# Altium PCB DIOT_Sampler_Adapter.PCBDOC (part 2 of 3)
Units mm, origin at the board's own origin, x right, y up, seen from the top; angles counter-clockwise.
Board outline 37 x 98.9 mm, 4 copper layers (L1, P2, L3, L4), stack 1.6 mm thick; 18 components, 14 nets, 57 pads, 0 vias.
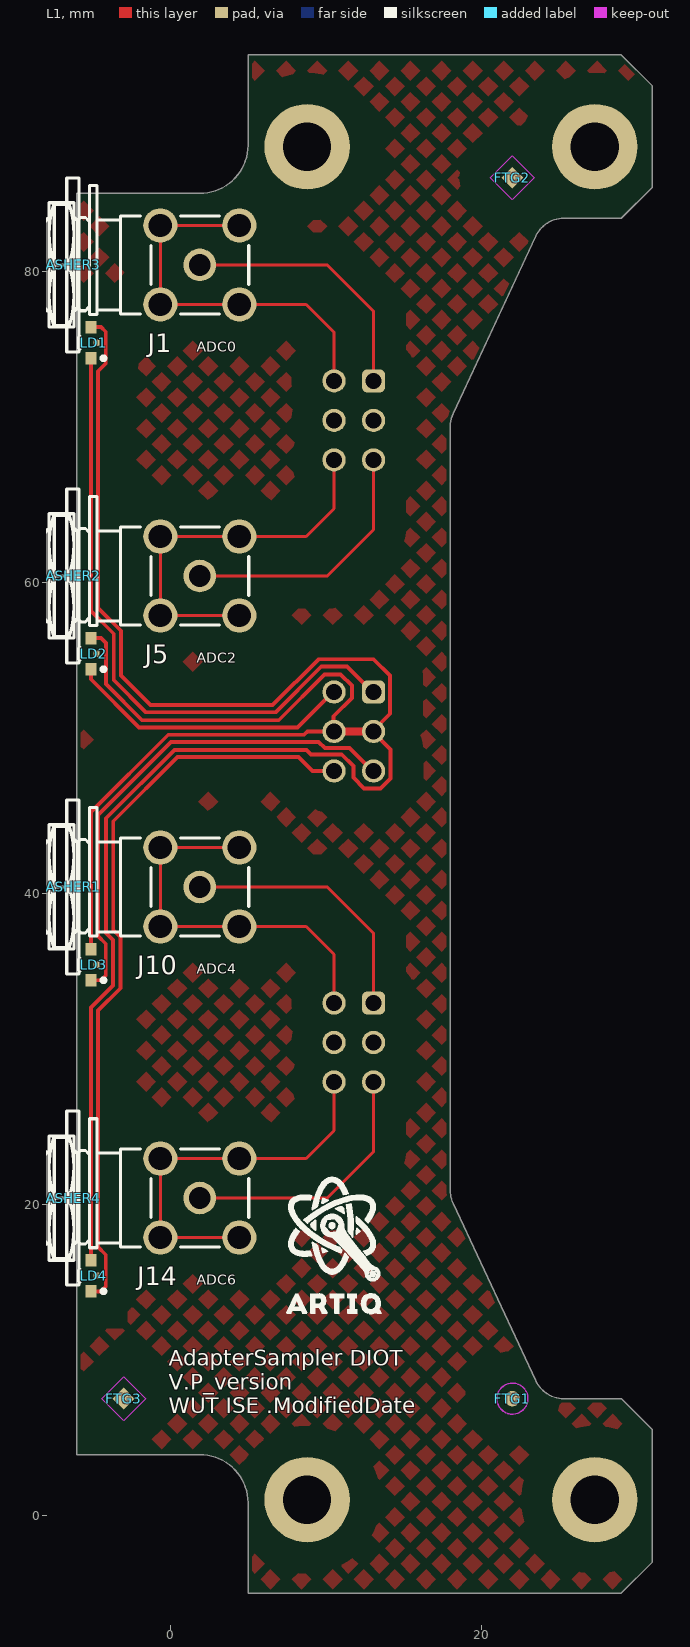
[diagram p0: L1 view]

## Keep-outs (continued)
KeepOutLayer: (continued)
  lines w0.254: -13.883,215.207 14.444,186.88 ; -13.883,217.207 14.444,188.88 ; -13.883,247.207 14.444,218.88 ; -13.883,249.207 14.444,220.88 ; -13.883,279.207 14.444,250.88 ; -13.883,281.207 14.444,252.88 ; -13.883,311.207 14.444,282.88 ; -13.883,313.207 14.444,284.88 ; -13.883,339.207 14.444,310.88 ; -13.883,341.207 14.444,312.88 ; -13.556,184.88 14.444,212.88 ; -13.556,214.88 -9.556,218.88 14.444,242.88 ; -13.556,216.88 14.444,244.88 ; -13.556,246.88 -9.556,250.88 14.444,274.88 ; -13.556,248.88 14.444,276.88 ; -13.556,278.88 -9.556,282.88 14.444,306.88 ; -13.556,280.88 14.444,308.88 ; -13.556,338.88 -9.556,342.88 ; -13.556,342.88 -11.556,340.88 14.444,314.88 ; -11.556,184.88 -13.556,186.88 14.444,214.88 ; -11.556,186.88 -13.556,188.88 14.444,216.88 ; -11.556,308.88 -13.556,310.88 ; -11.556,310.88 -13.556,312.88 14.444,340.88 ; -11.556,312.88 14.444,286.88 ; -11.556,314.88 14.444,288.88 ; -11.556,342.88 14.444,316.88 ; -9.556,184.88 14.444,208.88 ; -9.556,186.88 14.444,210.88 ; -9.556,308.88 14.444,332.88 ; -9.556,310.88 14.444,334.88 ; -9.556,312.88 -13.556,308.88 ; -9.556,314.88 -13.556,310.88 ; -9.556,340.88 -13.556,336.88 12.444,310.88 ; -7.556,184.88 -13.556,190.88 14.444,218.88 ; -7.556,186.88 -13.556,192.88 10.444,216.88 ; -7.556,308.88 -13.556,314.88 14.444,342.88 ; -7.556,310.88 -13.556,316.88 10.444,340.88 ; -7.556,312.88 14.444,290.88 ; -7.556,314.88 14.444,292.88 ; -7.556,340.88 14.444,318.88 ; -7.556,342.88 14.444,320.88 ; -5.556,184.88 14.444,204.88 ; -5.556,186.88 14.444,206.88 ; -5.556,308.88 14.444,328.88 ; -5.556,310.88 14.444,330.88 ; -5.556,312.88 -13.556,304.88 8.444,282.88 14.444,276.88 ; -5.556,314.88 -13.556,306.88 12.444,280.88 14.444,278.88 ; -5.556,340.88 -13.556,332.88 8.444,310.88 ; -5.556,342.88 -13.556,334.88 12.444,308.88 ; -3.556,184.88 -13.556,194.88 10.444,218.88 ; -3.556,186.88 -13.556,196.88 -11.556,198.88 ; -3.556,308.88 -13.556,318.88 10.444,342.88 ; -3.556,310.88 -13.556,320.88 -11.556,322.88 ; -3.556,314.88 -3.556,314.88 14.444,296.88 ; -1.556,184.88 14.444,200.88 ; -1.556,186.88 14.444,202.88 ; -1.556,308.88 14.444,324.88 ; -1.556,310.88 14.444,326.88 ; -1.556,314.88 -1.556,314.88 -13.556,302.88 8.444,280.88 14.444,274.88 ; 0.444,184.88 -13.556,198.88 -11.556,200.88 ; 0.444,186.88 -13.556,200.88 -11.556,202.88 ; 0.444,308.88 -13.556,322.88 -11.556,324.88 ; 0.444,310.88 -13.556,324.88 -11.556,326.88 ; 0.444,312.88 14.444,298.88 ; 0.444,314.88 14.444,300.88 ; 0.444,340.88 14.444,326.88 ; 0.444,342.88 14.444,328.88 ; 2.444,184.88 14.444,196.88 ; 2.444,186.88 14.444,198.88 ; 2.444,308.88 14.444,320.88 ; 2.444,310.88 14.444,322.88 ; 2.444,312.88 -11.556,298.88 ; 2.444,314.88 -11.556,300.88 ; 2.444,340.88 -11.556,326.88 ; 2.444,342.88 -11.556,328.88 ; 4.444,184.88 -13.556,202.88 -11.556,204.88 ; 4.444,186.88 -13.556,204.88 -1.556,216.88 ; 4.444,308.88 -13.556,326.88 -11.556,328.88 ; 4.444,310.88 -13.556,328.88 -1.556,340.88 ; 4.444,314.88 4.444,314.88 14.444,304.88 ; 6.444,184.88 14.444,192.88 ; 6.444,186.88 14.444,194.88 ; 6.444,308.88 14.444,316.88 ; 6.444,310.88 14.444,318.88 ; 6.444,312.88 -11.556,294.88 ; 6.444,314.88 -11.556,296.88 ; 6.444,340.88 -11.556,322.88 ; 6.444,342.88 -11.556,324.88 ; 8.444,184.88 -13.556,206.88 -1.556,218.88 ; 8.444,186.88 -13.556,208.88 -5.556,216.88 14.444,236.88 ; 8.444,308.88 -13.556,330.88 -1.556,342.88 ; 8.444,312.88 14.444,306.88 ; 8.444,314.88 14.444,308.88 ; 8.444,340.88 14.444,334.88 ; 8.444,342.88 14.444,336.88 ; 10.444,184.88 14.444,188.88 ; 10.444,186.88 14.444,190.88 ; 10.444,308.88 14.444,312.88 ; 10.444,310.88 14.444,314.88 ; 10.444,314.88 10.444,314.88 -13.556,290.88 -3.556,280.88 ; 12.444,184.88 -13.556,210.88 -5.556,218.88 14.444,238.88 ; 12.444,186.88 -13.556,212.88 -9.556,216.88 14.444,240.88 ; 12.444,312.88 14.444,310.88 ; 12.444,314.88 14.444,312.88 ; 12.444,340.88 14.444,338.88 ; 12.444,342.88 14.444,340.88 ; 14.117,215.207 42.444,186.88 ; 14.117,217.207 42.444,188.88 ; 14.117,247.207 42.444,218.88 ; 14.117,249.207 42.444,220.88 ; 14.117,279.207 42.444,250.88 ; 14.117,281.207 42.444,252.88 ; 14.117,311.207 42.444,282.88 ; 14.117,313.207 42.444,284.88 ; 14.117,339.207 42.444,310.88 ; 14.117,341.207 42.444,312.88 ; 14.444,184.88 42.444,212.88 ; 14.444,314.88 14.444,314.88 ; 16.444,184.88 14.444,186.88 ; 16.444,186.88 14.444,188.88 ; 16.444,308.88 14.444,310.88 ; 16.444,310.88 14.444,312.88 ; 16.444,312.88 42.444,286.88 ; 16.444,314.88 42.444,288.88 ; 16.444,342.88 42.444,316.88 ; 18.444,184.88 42.444,208.88 ; 18.444,186.88 42.444,210.88 ; 18.444,308.88 42.444,332.88 ; 18.444,310.88 42.444,334.88 ; 18.444,312.88 14.444,308.88 ; 18.444,314.88 14.444,310.88 ; 18.444,340.88 14.444,336.88 ; 18.444,342.88 14.444,338.88 ; 20.444,184.88 14.444,190.88 ; 20.444,186.88 14.444,192.88 ; 20.444,308.88 14.444,314.88 ; 20.444,310.88 14.444,316.88 ; 20.444,312.88 42.444,290.88 ; 20.444,314.88 42.444,292.88 ; 20.444,340.88 42.444,318.88 ; 20.444,342.88 42.444,320.88 ; 22.444,184.88 42.444,204.88 ; 22.444,186.88 42.444,206.88 ; 22.444,308.88 42.444,328.88 ; 22.444,310.88 42.444,330.88 ; 22.444,312.88 14.444,304.88 ; 22.444,314.88 14.444,306.88 ; 22.444,340.88 14.444,332.88 ; 22.444,342.88 14.444,334.88 ; 24.444,184.88 14.444,194.88 ; 24.444,186.88 14.444,196.88 ; 24.444,308.88 14.444,318.88 ; 24.444,310.88 14.444,320.88 ; 24.444,314.88 24.444,314.88 42.444,296.88 ; 26.444,184.88 42.444,200.88 ; 26.444,186.88 42.444,202.88 ; 26.444,308.88 42.444,324.88 ; 26.444,310.88 42.444,326.88 ; 26.444,314.88 26.444,314.88 14.444,302.88 ; 28.444,184.88 14.444,198.88 ; 28.444,186.88 14.444,200.88 ; 28.444,308.88 14.444,322.88 ; 28.444,310.88 14.444,324.88 ; 28.444,312.88 42.444,298.88 ; 28.444,314.88 42.444,300.88 ; 28.444,340.88 42.444,326.88 ; 28.444,342.88 42.444,328.88 ; 30.444,184.88 42.444,196.88 ; 30.444,186.88 42.444,198.88 ; 30.444,308.88 42.444,320.88 ; 30.444,310.88 42.444,322.88 ; 30.444,312.88 16.444,298.88 ; 30.444,314.88 16.444,300.88 ; 30.444,340.88 16.444,326.88 ; 30.444,342.88 16.444,328.88 ; 32.444,184.88 14.444,202.88 ; 32.444,186.88 14.444,204.88 ; 32.444,308.88 14.444,326.88 ; 32.444,310.88 14.444,328.88 ; 32.444,314.88 32.444,314.88 42.444,304.88 ; 34.444,184.88 42.444,192.88 ; 34.444,186.88 42.444,194.88 ; 34.444,308.88 42.444,316.88 ; 34.444,310.88 42.444,318.88 ; 34.444,312.88 16.444,294.88 ; 34.444,314.88 16.444,296.88 ; 34.444,340.88 16.444,322.88 ; 34.444,342.88 16.444,324.88 ; 36.444,184.88 14.444,206.88 ; 36.444,186.88 14.444,208.88 ; 36.444,308.88 14.444,330.88 ; 36.444,310.88 14.444,332.88 ; 36.444,312.88 42.444,306.88 ; 36.444,314.88 42.444,308.88 ; 36.444,340.88 42.444,334.88 ; 36.444,342.88 42.444,336.88 ; 38.444,184.88 42.444,188.88 ; 38.444,186.88 42.444,190.88 ; 38.444,308.88 42.444,312.88 ; 38.444,310.88 42.444,314.88 ; 38.444,314.88 38.444,314.88 14.444,290.88 ; 40.444,184.88 14.444,210.88 ; 40.444,186.88 14.444,212.88 ; 40.444,308.88 14.444,334.88 ; 40.444,310.88 14.444,336.88 ; 40.444,312.88 42.444,310.88 ; 40.444,314.88 42.444,312.88 ; 40.444,340.88 42.444,338.88 ; 40.444,342.88 42.444,340.88 ; 42.117,215.207 70.444,186.88 ; 42.117,217.207 70.444,188.88 ; 42.117,247.207 70.444,218.88 42.444,190.88 ; 42.117,249.207 70.444,220.88 ; 42.117,279.207 70.444,250.88 42.444,222.88 ; 42.117,281.207 70.444,252.88 ; 42.117,311.207 70.444,282.88 42.444,254.88 ; 42.117,313.207 70.444,284.88 ; 42.117,339.207 70.444,310.88 42.444,282.88 ; 42.117,341.207 70.444,312.88 42.444,284.88 ; 42.444,184.88 70.444,212.88 ; 42.444,314.88 42.444,314.88 ; 44.444,184.88 42.444,186.88 ; 44.444,186.88 42.444,188.88 ; 44.444,308.88 42.444,310.88 ; 44.444,310.88 42.444,312.88 ; 44.444,312.88 70.444,286.88 ; 44.444,314.88 70.444,288.88 ; 44.444,342.88 70.444,316.88 ; 46.444,184.88 70.444,208.88 60.444,218.88 ; 46.444,186.88 70.444,210.88 ; 46.444,308.88 70.444,332.88 60.444,342.88 ; 46.444,310.88 70.444,334.88 ; 46.444,312.88 42.444,308.88 ; 46.444,314.88 42.444,310.88 ; 46.444,340.88 42.444,336.88 ; 46.444,342.88 42.444,338.88 ; 48.444,184.88 42.444,190.88 ; 48.444,186.88 42.444,192.88 ; 48.444,308.88 42.444,314.88 ; 48.444,310.88 42.444,316.88 ; 48.444,312.88 70.444,290.88 ; 48.444,314.88 70.444,292.88 58.444,280.88 44.444,266.88 ; 48.444,340.88 70.444,318.88 ; 48.444,342.88 70.444,320.88 58.444,308.88 ; 50.444,184.88 70.444,204.88 56.444,218.88 42.444,232.88 ; 50.444,186.88 70.444,206.88 60.444,216.88 ; 50.444,308.88 70.444,328.88 56.444,342.88 ; 50.444,310.88 70.444,330.88 60.444,340.88 ; 50.444,312.88 42.444,304.88 ; 50.444,314.88 42.444,306.88 ; 50.444,340.88 42.444,332.88 ; 50.444,342.88 42.444,334.88 ; 52.444,184.88 42.444,194.88 ; 52.444,186.88 42.444,196.88 ; 52.444,308.88 42.444,318.88 ; 52.444,310.88 42.444,320.88 ; 52.444,314.88 52.444,314.88 70.444,296.88 54.444,280.88 ; 54.444,184.88 70.444,200.88 52.444,218.88 ; 54.444,186.88 70.444,202.88 56.444,216.88 42.444,230.88 ; 54.444,308.88 70.444,324.88 52.444,342.88 ; 54.444,310.88 70.444,326.88 56.444,340.88 ; 54.444,314.88 54.444,314.88 42.444,302.88 ; 56.444,184.88 42.444,198.88 ; 56.444,186.88 42.444,200.88 ; 56.444,308.88 42.444,322.88 ; 56.444,310.88 42.444,324.88 ; 56.444,312.88 70.444,298.88 54.444,282.88 ; 56.444,314.88 70.444,300.88 50.444,280.88 42.444,272.88 ; 58.444,184.88 70.444,196.88 48.444,218.88 42.444,224.88 ; 58.444,186.88 70.444,198.88 52.444,216.88 ; 58.444,310.88 70.444,322.88 52.444,340.88 ; 58.444,312.88 44.444,298.88 ; 58.444,314.88 44.444,300.88 ; 58.444,340.88 44.444,326.88 ; 58.444,342.88 44.444,328.88 ; 60.444,184.88 42.444,202.88 ; 60.444,186.88 42.444,204.88 ; 60.444,308.88 42.444,326.88 ; 60.444,310.88 42.444,328.88 ; 60.444,314.88 60.444,314.88 70.444,304.88 46.444,280.88 42.444,276.88 ; 62.444,340.88 44.444,322.88 ; 62.444,342.88 44.444,324.88 ; 62.444,216.88 44.444,198.88 ; 62.444,218.88 44.444,200.88 ; 62.444,248.88 44.444,230.88 ; 62.444,250.88 44.444,232.88 ; 62.444,280.88 44.444,262.88 ; 62.444,282.88 44.444,264.88 ; 62.444,312.88 44.444,294.88 ; 62.444,314.88 44.444,296.88 ; 64.444,184.88 42.444,206.88 ; 64.444,186.88 42.444,208.88 ; 64.444,216.88 42.444,238.88 ; 64.444,218.88 42.444,240.88 ; 64.444,248.88 42.444,270.88 ; 64.444,250.88 42.444,272.88 ; 64.444,280.88 42.444,302.88 ; 64.444,282.88 42.444,304.88 ; 64.444,308.88 42.444,330.88 ; 64.444,310.88 42.444,332.88 ; 66.444,216.88 42.444,192.88 ; 66.444,218.88 42.444,194.88 ; 66.444,248.88 42.444,224.88 ; 66.444,250.88 42.444,226.88 ; 66.444,280.88 42.444,256.88 ; 66.444,282.88 42.444,258.88 ; 66.444,312.88 42.444,288.88 ; 66.444,314.88 42.444,290.88 ; 66.444,340.88 42.444,316.88 ; 66.444,342.88 42.444,318.88 ; 68.444,184.88 42.444,210.88 ; 68.444,186.88 42.444,212.88 ; 68.444,216.88 42.444,242.88 ; 68.444,218.88 42.444,244.88 ; 68.444,248.88 42.444,274.88 ; 68.444,250.88 42.444,276.88 ; 68.444,280.88 42.444,306.88 ; 68.444,282.88 42.444,308.88 ; 68.444,308.88 42.444,334.88 ; 68.444,310.88 42.444,336.88 ; 70.444,190.88 44.444,216.88 42.444,218.88 ; 70.444,192.88 44.444,218.88 42.444,220.88 ; 70.444,194.88 48.444,216.88 42.444,222.88 ; 70.444,214.88 42.444,186.88 ; 70.444,216.88 42.444,188.88 ; 70.444,222.88 44.444,248.88 42.444,250.88 ; 70.444,224.88 44.444,250.88 42.444,252.88 ; 70.444,226.88 48.444,248.88 42.444,254.88 ; 70.444,242.88 46.444,218.88 42.444,214.88 ; 70.444,244.88 42.444,216.88 ; 70.444,246.88 42.444,218.88 ; 70.444,248.88 42.444,220.88 ; 70.444,254.88 44.444,280.88 42.444,282.88 ; 70.444,256.88 44.444,282.88 42.444,284.88 ; 70.444,258.88 48.444,280.88 42.444,286.88 ; 70.444,274.88 46.444,250.88 42.444,246.88 ; 70.444,276.88 42.444,248.88 ; 70.444,278.88 42.444,250.88 ; 70.444,280.88 42.444,252.88 ; 70.444,306.88 46.444,282.88 42.444,278.88 ; 70.444,308.88 42.444,280.88 ; 70.444,336.88 42.444,308.88 ; 70.444,338.88 42.444,310.88 ; 70.444,340.88 42.444,312.88 ; 70.444,342.88 42.444,314.88 ; -13.556,308.88 12.444,282.88 14.444,280.88 ; -13.556,308.88 14.444,336.88 ; -13.556,310.88 14.444,338.88 ; -11.556,198.88 -11.556,198.88 ; -11.556,198.88 6.444,216.88 14.444,224.88 ; -11.556,200.88 -11.556,200.88 ; -11.556,200.88 6.444,218.88 14.444,226.88 ; -11.556,202.88 -11.556,202.88 ; -11.556,202.88 2.444,216.88 14.444,228.88 ; -11.556,204.88 2.444,218.88 14.444,230.88 ; -11.556,204.88 -11.556,204.88 ; -11.556,230.88 -13.556,228.88 -3.556,218.88 ; -11.556,230.88 -11.556,230.88 ; -11.556,230.88 6.444,248.88 14.444,256.88 ; -11.556,232.88 -13.556,230.88 0.444,216.88 14.444,202.88 ; -11.556,232.88 -11.556,232.88 ; -11.556,232.88 6.444,250.88 14.444,258.88 ; -11.556,234.88 -11.556,234.88 ; -11.556,234.88 -13.556,232.88 0.444,218.88 14.444,204.88 ; -11.556,234.88 2.444,248.88 14.444,260.88 ; -11.556,236.88 -13.556,234.88 4.444,216.88 ; -11.556,236.88 -11.556,236.88 ; -11.556,236.88 2.444,250.88 14.444,262.88 ; -11.556,262.88 6.444,280.88 14.444,288.88 ; -11.556,262.88 -11.556,262.88 ; -11.556,262.88 -13.556,260.88 -3.556,250.88 ; -11.556,264.88 -13.556,262.88 0.444,248.88 14.444,234.88 ; -11.556,264.88 -11.556,264.88 ; -11.556,264.88 6.444,282.88 14.444,290.88 ; -11.556,266.88 2.444,280.88 14.444,292.88 ; -11.556,266.88 -11.556,266.88 ; -11.556,266.88 -13.556,264.88 0.444,250.88 14.444,236.88 ; -11.556,268.88 -11.556,268.88 ; -11.556,268.88 -13.556,266.88 4.444,248.88 ; -11.556,268.88 2.444,282.88 14.444,294.88 ; -11.556,294.88 -13.556,292.88 -3.556,282.88 ; -11.556,294.88 -11.556,294.88 ; -11.556,296.88 -13.556,294.88 0.444,280.88 14.444,266.88 ; -11.556,296.88 -11.556,296.88 ; -11.556,298.88 -11.556,298.88 ; -11.556,298.88 -13.556,296.88 0.444,282.88 14.444,268.88 ; -11.556,300.88 -11.556,300.88 ; -11.556,300.88 -13.556,298.88 4.444,280.88 ; -11.556,322.88 -11.556,322.88 ; -11.556,324.88 -11.556,324.88 ; -11.556,326.88 -11.556,326.88 ; -11.556,328.88 -11.556,328.88 ; -3.556,216.88 -3.556,216.88 ; -3.556,216.88 14.444,198.88 ; -3.556,216.88 -13.556,226.88 10.444,250.88 ; -3.556,218.88 -3.556,218.88 ; -3.556,218.88 14.444,200.88 ; -3.556,248.88 -13.556,258.88 10.444,282.88 ; -3.556,248.88 -3.556,248.88 ; -3.556,248.88 14.444,230.88 ; -3.556,250.88 -3.556,250.88 ; -3.556,250.88 14.444,232.88 ; -3.556,280.88 14.444,262.88 ; -3.556,280.88 -3.556,280.88 ; -3.556,282.88 -3.556,282.88 ; -3.556,282.88 14.444,264.88 ; -3.556,312.88 14.444,294.88 ; -3.556,312.88 -3.556,312.88 ; -3.556,340.88 -3.556,340.88 ; -3.556,340.88 14.444,322.88 ; -3.556,342.88 -3.556,342.88 ; -3.556,342.88 14.444,324.88 ; -1.556,216.88 -1.556,216.88 ; -1.556,216.88 14.444,232.88 ; -1.556,218.88 -1.556,218.88 ; -1.556,218.88 14.444,234.88 ; -1.556,248.88 -1.556,248.88 ; -1.556,248.88 14.444,264.88 ; -1.556,248.88 -13.556,236.88 4.444,218.88 ; -1.556,250.88 -1.556,250.88 ; -1.556,250.88 14.444,266.88 ; -1.556,250.88 -13.556,238.88 8.444,216.88 14.444,210.88 ; -1.556,280.88 14.444,296.88 ; -1.556,280.88 -1.556,280.88 ; -1.556,280.88 -13.556,268.88 4.444,250.88 ; -1.556,282.88 -1.556,282.88 ; -1.556,282.88 14.444,298.88 ; -1.556,282.88 -13.556,270.88 8.444,248.88 14.444,242.88 ; -1.556,312.88 -1.556,312.88 ; -1.556,312.88 -13.556,300.88 4.444,282.88 ; -1.556,340.88 -1.556,340.88 ; -1.556,342.88 -1.556,342.88 ; 4.444,216.88 4.444,216.88 ; 4.444,216.88 14.444,206.88 ; 4.444,218.88 4.444,218.88 ; 4.444,218.88 14.444,208.88 ; 4.444,248.88 14.444,238.88 ; 4.444,248.88 4.444,248.88 ; 4.444,250.88 4.444,250.88 ; 4.444,250.88 14.444,240.88 ; 4.444,280.88 14.444,270.88 ; 4.444,280.88 4.444,280.88 ; 4.444,282.88 4.444,282.88 ; 4.444,282.88 14.444,272.88 ; 4.444,312.88 14.444,302.88 ; 4.444,312.88 4.444,312.88 ; 4.444,340.88 4.444,340.88 ; 4.444,340.88 14.444,330.88 ; 4.444,342.88 4.444,342.88 ; 4.444,342.88 14.444,332.88 ; 10.444,216.88 10.444,216.88 ; 10.444,216.88 14.444,220.88 ; 10.444,218.88 10.444,218.88 ; 10.444,218.88 14.444,222.88 ; 10.444,248.88 10.444,248.88 ; 10.444,248.88 14.444,252.88 ; 10.444,248.88 -13.556,224.88 -7.556,218.88 14.444,196.88 ; 10.444,250.88 10.444,250.88 ; 10.444,250.88 14.444,254.88 ; 10.444,280.88 14.444,284.88 ; 10.444,280.88 10.444,280.88 ; 10.444,280.88 -13.556,256.88 -7.556,250.88 14.444,228.88 ; 10.444,282.88 10.444,282.88 ; 10.444,282.88 14.444,286.88 ; 10.444,312.88 10.444,312.88 ; 10.444,312.88 -13.556,288.88 -7.556,282.88 14.444,260.88 ; 10.444,340.88 10.444,340.88 ; 10.444,342.88 10.444,342.88 ; 14.444,186.88 42.444,214.88 ; 14.444,188.88 14.444,188.88 ; 14.444,188.88 42.444,216.88 ; 14.444,190.88 42.444,218.88 ; 14.444,190.88 -11.556,216.88 -13.556,218.88 14.444,246.88 ; 14.444,190.88 14.444,190.88 ; 14.444,192.88 -11.556,218.88 -13.556,220.88 14.444,248.88 ; 14.444,192.88 38.444,216.88 ; 14.444,194.88 38.444,218.88 ; 14.444,194.88 -7.556,216.88 -13.556,222.88 14.444,250.88 ; 14.444,196.88 16.444,198.88 ; 14.444,198.88 16.444,200.88 ; 14.444,200.88 16.444,202.88 ; 14.444,202.88 16.444,204.88 ; 14.444,204.88 26.444,216.88 ; 14.444,206.88 26.444,218.88 ; 14.444,208.88 22.444,216.88 42.444,236.88 ; 14.444,210.88 14.444,210.88 ; 14.444,210.88 22.444,218.88 42.444,238.88 ; 14.444,212.88 14.444,212.88 ; 14.444,212.88 18.444,216.88 42.444,240.88 ; 14.444,212.88 8.444,218.88 -13.556,240.88 -5.556,248.88 14.444,268.88 ; 14.444,214.88 12.444,216.88 -13.556,242.88 -5.556,250.88 14.444,270.88 ; 14.444,214.88 14.444,214.88 ; 14.444,214.88 18.444,218.88 42.444,242.88 ; 14.444,216.88 42.444,244.88 ; 14.444,216.88 12.444,218.88 -13.556,244.88 -9.556,248.88 14.444,272.88 ; 14.444,216.88 14.444,216.88 ; 14.444,216.88 14.444,216.88 ; 14.444,218.88 42.444,246.88 ; 14.444,218.88 14.444,218.88 ; 14.444,218.88 16.444,216.88 42.444,190.88 ; 14.444,220.88 42.444,248.88 ; 14.444,220.88 16.444,218.88 42.444,192.88 ; 14.444,220.88 14.444,220.88 ; 14.444,222.88 -11.556,248.88 -13.556,250.88 14.444,278.88 ; 14.444,222.88 42.444,250.88 ; 14.444,222.88 20.444,216.88 42.444,194.88 ; 14.444,222.88 14.444,222.88 ; 14.444,224.88 -11.556,250.88 -13.556,252.88 14.444,280.88 ; 14.444,224.88 38.444,248.88 ; 14.444,224.88 20.444,218.88 42.444,196.88 ; 14.444,226.88 -7.556,248.88 -13.556,254.88 14.444,282.88 ; 14.444,226.88 38.444,250.88 ; 14.444,226.88 24.444,216.88 ; 14.444,228.88 24.444,218.88 ; 14.444,228.88 16.444,230.88 ; 14.444,230.88 16.444,232.88 ; 14.444,230.88 28.444,216.88 42.444,202.88 ; 14.444,232.88 16.444,234.88 ; 14.444,232.88 28.444,218.88 42.444,204.88 ; 14.444,234.88 16.444,236.88 ; 14.444,234.88 32.444,216.88 ; 14.444,236.88 26.444,248.88 ; 14.444,236.88 32.444,218.88 ; 14.444,238.88 26.444,250.88 ; 14.444,238.88 36.444,216.88 42.444,210.88 ; 14.444,240.88 22.444,248.88 42.444,268.88 ; 14.444,240.88 36.444,218.88 42.444,212.88 ; 14.444,242.88 14.444,242.88 ; 14.444,242.88 22.444,250.88 42.444,270.88 ; 14.444,242.88 40.444,216.88 42.444,214.88 ; 14.444,244.88 8.444,250.88 -13.556,272.88 -5.556,280.88 14.444,300.88 ; 14.444,244.88 14.444,244.88 ; 14.444,244.88 18.444,248.88 42.444,272.88 ; 14.444,244.88 40.444,218.88 42.444,216.88 ; 14.444,246.88 14.444,246.88 ; 14.444,246.88 12.444,248.88 -13.556,274.88 -5.556,282.88 14.444,302.88 ; 14.444,246.88 18.444,250.88 42.444,274.88 ; 14.444,248.88 12.444,250.88 -13.556,276.88 -9.556,280.88 14.444,304.88 ; 14.444,248.88 14.444,248.88 ; 14.444,248.88 14.444,248.88 ; 14.444,248.88 42.444,276.88 ; 14.444,250.88 16.444,248.88 42.444,222.88 ; 14.444,250.88 14.444,250.88 ; 14.444,250.88 42.444,278.88 ; 14.444,252.88 16.444,250.88 42.444,224.88 ; 14.444,252.88 14.444,252.88 ; 14.444,252.88 42.444,280.88 ; 14.444,254.88 20.444,248.88 42.444,226.88 ; 14.444,254.88 14.444,254.88 ; 14.444,254.88 42.444,282.88 ; 14.444,254.88 -11.556,280.88 -13.556,282.88 14.444,310.88 ; 14.444,256.88 20.444,250.88 42.444,228.88 ; 14.444,256.88 38.444,280.88 ; 14.444,256.88 -11.556,282.88 -13.556,284.88 14.444,312.88 ; 14.444,258.88 24.444,248.88 ; 14.444,258.88 38.444,282.88 ; 14.444,258.88 -7.556,280.88 -13.556,286.88 14.444,314.88 ; 14.444,260.88 24.444,250.88 ; 14.444,260.88 16.444,262.88 ; 14.444,262.88 16.444,264.88 ; 14.444,262.88 28.444,248.88 42.444,234.88 ; 14.444,264.88 16.444,266.88 ; 14.444,264.88 28.444,250.88 42.444,236.88 ; 14.444,266.88 16.444,268.88 ; 14.444,266.88 32.444,248.88 ; 14.444,268.88 26.444,280.88 ; 14.444,268.88 32.444,250.88 ; 14.444,270.88 26.444,282.88 ; 14.444,270.88 36.444,248.88 42.444,242.88 ; 14.444,272.88 22.444,280.88 42.444,300.88 ; 14.444,272.88 36.444,250.88 42.444,244.88 ; 14.444,274.88 14.444,274.88 ; 14.444,274.88 22.444,282.88 42.444,302.88 ; 14.444,274.88 40.444,248.88 42.444,246.88 ; 14.444,276.88 14.444,276.88 ; 14.444,276.88 18.444,280.88 42.444,304.88 ; 14.444,276.88 40.444,250.88 42.444,248.88 ; 14.444,278.88 14.444,278.88 ; 14.444,278.88 18.444,282.88 42.444,306.88 ; 14.444,280.88 14.444,280.88 ; 14.444,280.88 14.444,280.88 ; 14.444,280.88 42.444,308.88 ; 14.444,282.88 16.444,280.88 42.444,254.88 ; 14.444,282.88 14.444,282.88 ; 14.444,282.88 42.444,310.88 ; 14.444,284.88 14.444,284.88 ; 14.444,284.88 42.444,312.88 ; 14.444,284.88 16.444,282.88 42.444,256.88 ; 14.444,286.88 14.444,286.88 ; 14.444,286.88 42.444,314.88 ; 14.444,286.88 20.444,280.88 42.444,258.88 ; 14.444,288.88 38.444,312.88 ; 14.444,288.88 20.444,282.88 42.444,260.88 ; 14.444,290.88 24.444,280.88 ; 14.444,292.88 24.444,282.88 ; 14.444,292.88 16.444,294.88 ; 14.444,294.88 28.444,280.88 42.444,266.88 ; 14.444,294.88 16.444,296.88 ; 14.444,296.88 28.444,282.88 42.444,268.88 ; 14.444,296.88 16.444,298.88 ; 14.444,298.88 32.444,280.88 ; 14.444,298.88 16.444,300.88 ; 14.444,300.88 26.444,312.88 ; 14.444,300.88 32.444,282.88 ; 14.444,302.88 36.444,280.88 42.444,274.88 ; 14.444,304.88 36.444,282.88 42.444,276.88 ; 14.444,306.88 14.444,306.88 ; 14.444,306.88 40.444,280.88 42.444,278.88 ; 14.444,308.88 14.444,308.88 ; 14.444,308.88 42.444,336.88 ; 14.444,308.88 40.444,282.88 42.444,280.88 ; 14.444,310.88 14.444,310.88 ; 14.444,310.88 42.444,338.88 ; 14.444,312.88 14.444,312.88 ; 14.444,312.88 14.444,312.88 ; 14.444,312.88 14.444,312.88 ; 14.444,312.88 42.444,340.88 ; 14.444,314.88 14.444,314.88 ; 14.444,314.88 42.444,342.88 ; 14.444,316.88 38.444,340.88 ; 14.444,318.88 38.444,342.88 ; 14.444,320.88 16.444,322.88 ; 14.444,322.88 16.444,324.88 ; 14.444,324.88 16.444,326.88 ; 14.444,326.88 16.444,328.88 ; 14.444,328.88 26.444,340.88 ; 14.444,330.88 26.444,342.88 ; 14.444,334.88 14.444,334.88 ; 14.444,336.88 14.444,336.88 ; 14.444,338.88 14.444,338.88 ; 14.444,340.88 14.444,340.88 ; 14.444,340.88 14.444,340.88 ; 14.444,342.88 16.444,340.88 42.444,314.88 ; 14.444,342.88 14.444,342.88 ; 16.444,198.88 16.444,198.88 ; 16.444,198.88 34.444,216.88 42.444,224.88 ; 16.444,200.88 16.444,200.88 ; 16.444,200.88 34.444,218.88 42.444,226.88 ; 16.444,202.88 16.444,202.88 ; 16.444,202.88 30.444,216.88 42.444,228.88 ; 16.444,204.88 16.444,204.88 ; 16.444,204.88 30.444,218.88 42.444,230.88 ; 16.444,230.88 34.444,248.88 42.444,256.88 ; 16.444,230.88 16.444,230.88 ; 16.444,232.88 34.444,250.88 42.444,258.88 ; 16.444,232.88 16.444,232.88 ; 16.444,234.88 30.444,248.88 42.444,260.88 ; 16.444,234.88 16.444,234.88 ; 16.444,236.88 30.444,250.88 42.444,262.88 ; 16.444,236.88 16.444,236.88 ; 16.444,262.88 16.444,262.88 ; 16.444,262.88 34.444,280.88 42.444,288.88 ; 16.444,264.88 16.444,264.88 ; 16.444,264.88 34.444,282.88 42.444,290.88 ; 16.444,266.88 16.444,266.88 ; 16.444,266.88 30.444,280.88 42.444,292.88 ; 16.444,268.88 16.444,268.88 ; 16.444,268.88 30.444,282.88 42.444,294.88 ; 16.444,294.88 16.444,294.88 ; 16.444,296.88 16.444,296.88 ; 16.444,298.88 16.444,298.88 ; 16.444,300.88 16.444,300.88 ; 16.444,322.88 16.444,322.88 ; 16.444,324.88 16.444,324.88 ; 16.444,326.88 16.444,326.88 ; 16.444,328.88 16.444,328.88 ; 24.444,216.88 42.444,198.88 ; 24.444,216.88 24.444,216.88 ; 24.444,218.88 42.444,200.88 ; 24.444,218.88 24.444,218.88 ; 24.444,248.88 24.444,248.88 ; 24.444,248.88 42.444,230.88 ; 24.444,250.88 24.444,250.88 ; 24.444,250.88 42.444,232.88 ; 24.444,280.88 24.444,280.88 ; 24.444,280.88 42.444,262.88 ; 24.444,282.88 24.444,282.88 ; 24.444,282.88 42.444,264.88 ; 24.444,312.88 42.444,294.88 ; 24.444,312.88 24.444,312.88 ; 24.444,340.88 24.444,340.88 ; 24.444,340.88 42.444,322.88 ; 24.444,342.88 24.444,342.88 ; 24.444,342.88 42.444,324.88 ; 26.444,216.88 42.444,232.88 ; 26.444,216.88 26.444,216.88 ; 26.444,218.88 42.444,234.88 ; 26.444,218.88 26.444,218.88 ; 26.444,248.88 26.444,248.88 ; 26.444,248.88 42.444,264.88 ; 26.444,250.88 26.444,250.88 ; 26.444,250.88 42.444,266.88 ; 26.444,280.88 26.444,280.88 ; 26.444,280.88 42.444,296.88 ; 26.444,282.88 26.444,282.88 ; 26.444,282.88 42.444,298.88 ; 26.444,312.88 26.444,312.88 ; 26.444,340.88 26.444,340.88 ; 26.444,342.88 26.444,342.88 ; 32.444,216.88 42.444,206.88 ; 32.444,216.88 32.444,216.88 ; 32.444,218.88 42.444,208.88 ; 32.444,218.88 32.444,218.88 ; 32.444,248.88 32.444,248.88 ; 32.444,248.88 42.444,238.88 ; 32.444,250.88 32.444,250.88 ; 32.444,250.88 42.444,240.88 ; 32.444,280.88 42.444,270.88 ; 32.444,280.88 32.444,280.88 ; 32.444,282.88 42.444,272.88 ; 32.444,282.88 32.444,282.88 ; 32.444,312.88 32.444,312.88 ; 32.444,312.88 42.444,302.88 ; 32.444,340.88 42.444,330.88 ; 32.444,340.88 32.444,340.88 ; 32.444,342.88 32.444,342.88 ; 32.444,342.88 42.444,332.88 ; 38.444,216.88 38.444,216.88 ; 38.444,216.88 42.444,220.88 ; 38.444,218.88 42.444,222.88 ; 38.444,218.88 38.444,218.88 ; 38.444,248.88 38.444,248.88 ; 38.444,248.88 42.444,252.88 ; 38.444,250.88 42.444,254.88 ; 38.444,250.88 38.444,250.88 ; 38.444,280.88 38.444,280.88 ; 38.444,280.88 42.444,284.88 ; 38.444,282.88 38.444,282.88 ; 38.444,282.88 42.444,286.88 ; 38.444,312.88 38.444,312.88 ; 38.444,340.88 38.444,340.88 ; 38.444,342.88 38.444,342.88 ; 42.444,188.88 42.444,188.88 ; 42.444,190.88 42.444,190.88 ; 42.444,196.88 44.444,198.88 ; 42.444,198.88 44.444,200.88 ; 42.444,200.88 44.444,202.88 ; 42.444,202.88 44.444,204.88 ; 42.444,204.88 54.444,216.88 ; 42.444,206.88 54.444,218.88 ; 42.444,208.88 50.444,216.88 70.444,236.88 56.444,250.88 42.444,264.88 ; 42.444,210.88 42.444,210.88 ; 42.444,210.88 50.444,218.88 70.444,238.88 60.444,248.88 ; 42.444,212.88 42.444,212.88 ; 42.444,212.88 46.444,216.88 70.444,240.88 60.444,250.88 ; 42.444,214.88 42.444,214.88 ; 42.444,216.88 42.444,216.88 ; 42.444,216.88 42.444,216.88 ; 42.444,218.88 42.444,218.88 ; 42.444,220.88 42.444,220.88 ; 42.444,222.88 42.444,222.88 ; 42.444,226.88 52.444,216.88 ; 42.444,228.88 44.444,230.88 ; 42.444,228.88 52.444,218.88 ; 42.444,230.88 44.444,232.88 ; 42.444,232.88 44.444,234.88 ; 42.444,234.88 44.444,236.88 ; 42.444,234.88 60.444,216.88 ; 42.444,236.88 60.444,218.88 ; 42.444,236.88 54.444,248.88 ; 42.444,238.88 54.444,250.88 ; 42.444,240.88 50.444,248.88 70.444,268.88 56.444,282.88 42.444,296.88 ; 42.444,242.88 50.444,250.88 70.444,270.88 60.444,280.88 ; 42.444,242.88 42.444,242.88 ; 42.444,244.88 46.444,248.88 70.444,272.88 60.444,282.88 ; 42.444,244.88 42.444,244.88 ; 42.444,246.88 42.444,246.88 ; 42.444,248.88 42.444,248.88 ; 42.444,248.88 42.444,248.88 ; 42.444,250.88 42.444,250.88 ; 42.444,252.88 42.444,252.88 ; 42.444,254.88 42.444,254.88 ; 42.444,256.88 48.444,250.88 70.444,228.88 58.444,216.88 44.444,202.88 ; 42.444,258.88 52.444,248.88 ; 42.444,260.88 44.444,262.88 ; 42.444,260.88 52.444,250.88 ; 42.444,262.88 44.444,264.88 ; 42.444,262.88 56.444,248.88 70.444,234.88 54.444,218.88 ; 42.444,264.88 44.444,266.88 ; 42.444,266.88 44.444,268.88 ; 42.444,266.88 60.444,248.88 ; 42.444,268.88 54.444,280.88 ; 42.444,268.88 60.444,250.88 ; 42.444,270.88 54.444,282.88 ; 42.444,274.88 50.444,282.88 70.444,302.88 60.444,312.88 ; 42.444,274.88 42.444,274.88 ; 42.444,276.88 42.444,276.88 ; 42.444,278.88 42.444,278.88 ; 42.444,280.88 42.444,280.88 ; 42.444,280.88 42.444,280.88 ; 42.444,282.88 42.444,282.88 ; 42.444,284.88 42.444,284.88 ; 42.444,286.88 70.444,314.88 44.444,340.88 42.444,342.88 ; 42.444,286.88 42.444,286.88 ; 42.444,288.88 48.444,282.88 70.444,260.88 58.444,248.88 44.444,234.88 ; 42.444,290.88 52.444,280.88 ; 42.444,292.88 52.444,282.88 ; 42.444,292.88 44.444,294.88 ; 42.444,294.88 56.444,280.88 70.444,266.88 54.444,250.88 ; 42.444,294.88 44.444,296.88 ; 42.444,296.88 44.444,298.88 ; 42.444,298.88 60.444,280.88 ; 42.444,298.88 44.444,300.88 ; 42.444,300.88 54.444,312.88 ; 42.444,300.88 60.444,282.88 ; 42.444,306.88 42.444,306.88 ; 42.444,308.88 42.444,308.88 ; 42.444,310.88 42.444,310.88 ; 42.444,312.88 42.444,312.88 ; 42.444,312.88 42.444,312.88 ; 42.444,312.88 42.444,312.88 ; 42.444,314.88 42.444,314.88 ; 42.444,320.88 44.444,322.88 ; 42.444,322.88 44.444,324.88 ; 42.444,324.88 44.444,326.88 ; 42.444,326.88 44.444,328.88 ; 42.444,328.88 54.444,340.88 ; 42.444,330.88 54.444,342.88 ; 42.444,334.88 42.444,334.88 ; 42.444,336.88 42.444,336.88 ; 42.444,338.88 42.444,338.88 ; 42.444,340.88 42.444,340.88 ; 42.444,340.88 42.444,340.88 ; 42.444,342.88 42.444,342.88 ; 44.444,198.88 44.444,198.88 ; 44.444,200.88 44.444,200.88 ; 44.444,202.88 44.444,202.88 ; 44.444,204.88 44.444,204.88 ; 44.444,204.88 58.444,218.88 70.444,230.88 52.444,248.88 ; 44.444,230.88 44.444,230.88 ; 44.444,232.88 44.444,232.88 ; 44.444,234.88 44.444,234.88 ; 44.444,236.88 58.444,250.88 70.444,262.88 52.444,280.88 ; 44.444,236.88 44.444,236.88 ; 44.444,262.88 44.444,262.88 ; 44.444,264.88 44.444,264.88 ; 44.444,266.88 44.444,266.88 ; 44.444,268.88 44.444,268.88 ; 44.444,268.88 58.444,282.88 70.444,294.88 52.444,312.88 ; 44.444,294.88 44.444,294.88 ; 44.444,296.88 44.444,296.88 ; 44.444,298.88 44.444,298.88 ; 44.444,300.88 44.444,300.88 ; 44.444,322.88 44.444,322.88 ; 44.444,324.88 44.444,324.88 ; 44.444,326.88 44.444,326.88 ; 44.444,328.88 44.444,328.88 ; 52.444,216.88 52.444,216.88 ; 52.444,218.88 52.444,218.88 ; 52.444,248.88 52.444,248.88 ; 52.444,250.88 70.444,232.88 54.444,216.88 ; 52.444,250.88 52.444,250.88 ; 52.444,280.88 52.444,280.88 ; 52.444,282.88 52.444,282.88 ; 52.444,282.88 70.444,264.88 54.444,248.88 ; 52.444,312.88 52.444,312.88 ; 52.444,340.88 52.444,340.88 ; 52.444,342.88 52.444,342.88 ; 54.444,216.88 54.444,216.88 ; 54.444,218.88 54.444,218.88 ; 54.444,248.88 54.444,248.88 ; 54.444,250.88 54.444,250.88 ; 54.444,280.88 54.444,280.88 ; 54.444,282.88 54.444,282.88 ; 54.444,312.88 54.444,312.88 ; 54.444,340.88 54.444,340.88 ; 54.444,342.88 54.444,342.88 ; 60.444,216.88 60.444,216.88 ; 60.444,218.88 60.444,218.88 ; 60.444,248.88 60.444,248.88 ; 60.444,250.88 60.444,250.88 ; 60.444,280.88 60.444,280.88 ; 60.444,282.88 60.444,282.88 ; 60.444,312.88 60.444,312.88 ; 60.444,340.88 60.444,340.88 ; 60.444,342.88 60.444,342.88

## Silkscreen, mask and mechanical layers (free items; w line width, h text height)
TopOverlay:
  drawing of 1237 lines, arcs and shapes, not listed
  text "ADC0" at 1.7,74.6 h1.14
  text "ADC2" at 1.7,54.6 h1.14
  text "ADC4" at 1.7,34.6 h1.14
  text "ADC6" at 1.7,14.6 h1.14
  text "AdapterSampler DIOT / V.P_version / WUT ISE .ModifiedDate" at -0.097,6.558 h1.02
M1 Board Shape:
  circle w0.013: c11.8,90 r0.9
  circle w0.013: c23.8,90 r0.9
  circle w0.013: c11.8,2 r0.9
  circle w0.013: c23.8,2 r0.9
  lines w0.013: -6,3.9 1.9,3.9 cw(c1.9,0.8) 5,0.8 5,-5 29,-5 31,-3 31,5.5 29,7.5 25.313,7.5 cw(c25.313,9.5) 23.5,8.655 18.187,20.048 cw(c20,20.893) 18,20.893 18,70.007 cw(c20,70.007) 18.187,70.852 23.5,82.245 cw(c25.313,81.4) 25.313,83.4 29,83.4 31,85.4 31,91.9 29,93.9 5,93.9 5,88.1 cw(c1.9,88.1) 1.9,85 -6,85 -6,3.9
M2 Old Board Shape:
  lines w0.1: -6.114,-19.788 -6.114,102.894
Mechanical4:
  lines w1: 27.444,-0.12 27.444,89.88 102.444,89.88 102.444,-0.12 27.444,-0.12 ; 113.444,53.88 113.444,88.88 153.444,88.88 153.444,53.88 113.444,53.88